# Altium PCB BRD9057A_SiWx917M_4-Layer_ExtSw_REF_DES_A01.PcbDoc (part 2 of 3)
Units mm, origin at the board's own origin, x right, y up, seen from the top; angles counter-clockwise.
Board outline 30 x 45 mm, 4 copper layers (Top Layer, Signal Layer 2, Signal Layer 3, Bottom Layer), stack 1.527 mm thick; 95 components, 97 nets, 386 pads, 413 vias.
Unrouted connection lines stored in the file: 15.
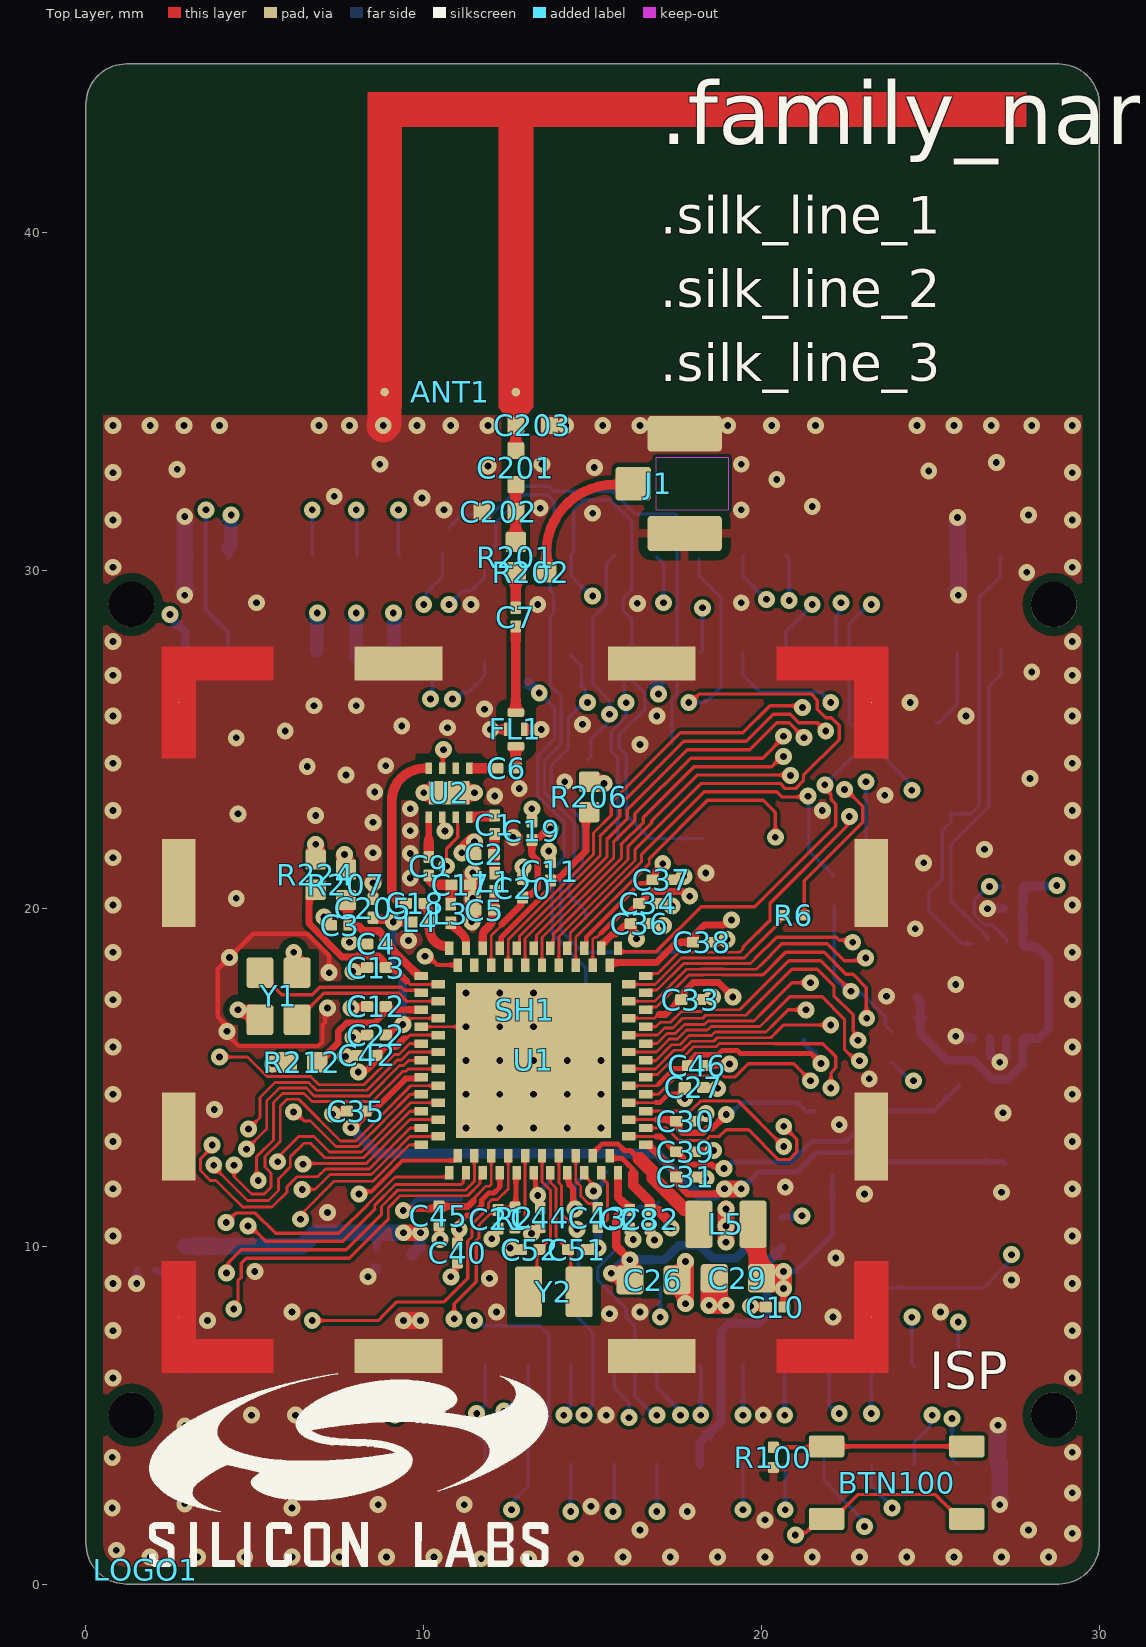
[diagram p0: Top Layer view]

## Via types
v1: diameter 0.5, hole 0.2, Top Layer to Bottom Layer, tented both sides, 372 vias
v2: diameter 0.5/0.5/0.5/0.5 (per signal layer), hole 0.2, Top Layer to Bottom Layer, tented both sides, 41 vias

## Nets (pads, with @x,y where several pads share a name; then routed paths per layer and width w, separated by ;. In a path a pad name is that pad's centre, name@x,y a point inside that pad or via, vN(x,y) a via of type N, cw(c..) or ccw(c..) an arc to the next point about the centre after c; other vN are vias at no path point) (continued)
NetU1_A13: (continued)
  Top Layer w0.1: Y1.1@5.15,18.1 5.15,18.066 5.498,17.719 5.531,17.719 5.8,17.45 6.7,17.45 6.917,17.667 9.34,17.667 9.432,17.576 9.716,17.576 9.85,17.575 U1.A13@9.925,17.5

## Text inside footprints (layer, text, board x,y; h text height)
M1: Bottom Pin marking "TPJ19" at 6.583,9.082 h1; Bottom Pin marking "TPJ18" at 8.993,10.134 h1; Bottom Pin marking "TPJ2" at 20.334,24.766 h1; Bottom Pin marking "TPJ12" at 24.467,25.154 h1; Bottom Pin marking "TPJ15" at 27.11,23.582 h1; Bottom Pin marking "TPJ6" at 19.044,22.84 h1; Bottom Pin marking "TPJ5" at 15.581,20.413 h1; Bottom Pin marking "TPJ14" at 27.226,20.965 h1; Bottom Pin marking "TPJ17" at 16.43,17.853 h1; Bottom Pin marking "TPJ11" at 29.139,14.481 h1; Bottom Pin marking "TPJ13" at 26.698,11.386 h1; Bottom Pin marking "TPJ3" at 17.746,12.02 h1; Bottom Pin marking "TPJ1" at 19.032,9.586 h1; Bottom Pin marking "TPJ16" at 22.818,8.406 h1; Bottom Pin marking "TPJ8" at 15.492,25.143 h1; Bottom Pin marking "TPJ7" at 16.041,22.743 h1; Bottom Pin marking "TPJ10" at 25.576,16.269 h1 r270; Bottom Pin marking "TPJ9" at 26.452,13.286 h1; Bottom Pin marking "TPJ4" at 19.038,20.243 h1; PCB constraints Bottom "Support / Pin" at 12.676,49.443 h0.76; PCB constraints Bottom "Support / Pin" at 37.576,4.293 h0.76; PCB constraints Bottom "Support / Pin" at 37.575,39.293 h0.76; PCB constraints Bottom "Support / Pin" at -12.224,39.293 h0.76; PCB constraints Bottom "Support / Pin" at 34.576,39.293 h0.76; PCB constraints Bottom "Support / Pin" at -9.224,39.293 h0.76; PCB constraints Bottom "Support / Pin" at 34.576,4.293 h0.76; PCB constraints Bottom "Support / Pin" at 12.676,53.083 h0.76; PCB constraints Bottom "Support / Pin" at -12.224,4.293 h0.76; PCB constraints Bottom "Support / Pin" at 12.677,-14.246 h0.76; PCB constraints Bottom "Support / Pin" at -9.224,4.293 h0.76; PCB constraints Bottom "TPRF2" at 4.646,34.849 h1.02; PCB constraints Bottom "TPRF1" at 22.359,34.798 h1.02; PCB constraints Bottom "Cutout" at 20.089,15.982 h1.52; PCB constraints Bottom "Cutout" at 13.015,29.219 h1.52; PCB constraints Bottom "Cutout" at 13.737,-2.099 h1.52; PCB constraints Bottom "TPJ19" at 4.048,9.058 h1.02; PCB constraints Bottom "TPJ12" at 23.786,26.079 h1.02; PCB constraints Bottom "TPJ11" at 24.981,15.431 h1.02; PCB constraints Bottom "TPJ16" at 22.308,9.418 h1.02; PCB constraints Bottom "TPJ13" at 21.915,13.899 h1.02; PCB constraints Bottom "TPJ17" at 13.599,17.739 h1.02; PCB constraints Bottom "TPJ3" at 15.957,11.899 h1.02; PCB constraints Bottom "TPJ1" at 16.003,9.381 h1.02; PCB constraints Bottom "TPJ15" at 24.32,23.476 h1.02; PCB constraints Bottom "TPJ14" at 24.42,20.868 h1.02; PCB constraints Bottom "TPJ10" at 25.34,16.967 h1.02; PCB constraints Bottom "TPJ9" at 26.084,13.144 h1.02; PCB constraints Bottom "TPJ8" at 13.865,25.072 h1.02; PCB constraints Bottom "TPJ2" at 16.423,25.566 h1.02; PCB constraints Bottom "TPJ7" at 14.701,22.78 h1.02; PCB constraints Bottom "TPJ6" at 17.247,22.742 h1.02; PCB constraints Bottom "TPJ4" at 16.99,20.242 h1.02; PCB constraints Bottom "TPJ5" at 13.751,20.361 h1.02; PCB constraints Bottom "TPJ18" at 6.178,10.044 h1.02; PCB constraints Bottom "TPJ20" at 1.342,0.128 h1.02; PCB constraints Top "Pressure" at -11.823,39.497 h1.52; PCB constraints Top "Pressure" at -11.823,4.458 h1.52; PCB constraints Top "Pressure" at 35.119,4.472 h1.52; PCB constraints Top "Pressure" at 35.248,39.564 h1.52
MARK4: Bottom Overlay "BOARD INFO" at 19.95,43.35 h1.52; Bottom Component Outline "BOARD INFO" at 19.95,43.35 h1.52; Bottom Courtyard "BOARD INFO" at 19.95,43.35 h1.52
P200: Bottom Pin marking "1" at 1.972,26.184 h0.5; Bottom Pin marking "2" at 1.985,31.785 h0.5; Bottom Pin marking "39" at 27.38,26.126 h0.5; Bottom Pin marking "40" at 27.49,31.806 h0.5
P201: Bottom Pin marking "1" at 2.35,1.997 h0.5; Bottom Pin marking "2" at 2.395,7.555 h0.5; Bottom Pin marking "39" at 27.7,2.003 h0.5; Bottom Pin marking "40" at 27.865,7.581 h0.5